# EAGLE board board (EAGLE 9.6.2)
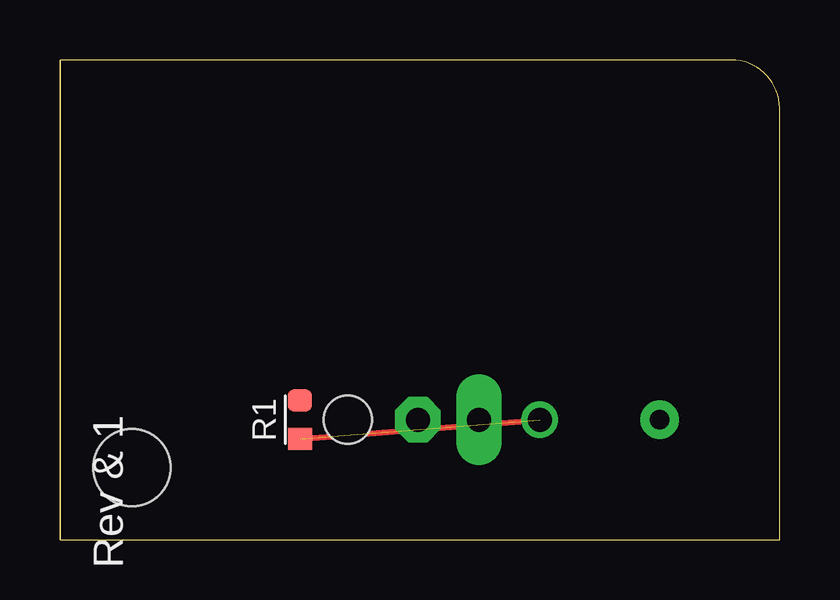
[diagram p0: board, top side]
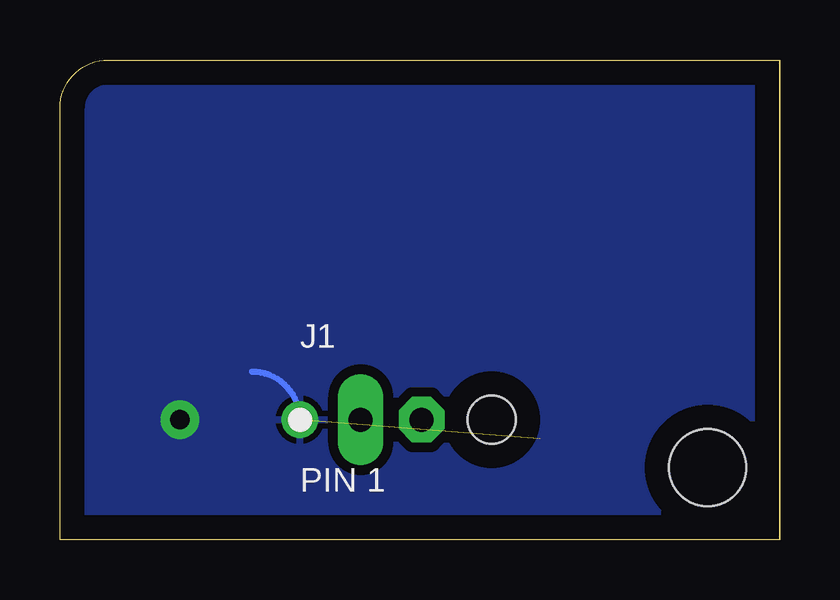
[diagram p1: board, bottom side, seen from below]

Size 30 x 20 mm. Coordinates in mm from the lower left corner, seen from the top.
Outline: 0,0 30,0 30,18 arc90 28,20 0,20
Outline: 0,20 0,0
Outline: 0,0 0,20
Copper layers (1*16): Top / Bottom
Design rules "demo": track to track 6mil, minimum pad ring 10mil, minimum via ring 8mil, stop-mask expansion 4mil, vias tented up to drill 0.5mm, thermal gap 10mil
Holes 3.2 mm at 3,3
layer 43: area 10,10 to 12,11

## Footprints (pad centres in the part's own frame; a part is rotated, then mirrored left to right if it is on the bottom)
HDR = drill 1: A 0,0 | drill 1 pad 1.9 long: B 2.54,0 | drill 1 pad 1.9 octagon: C 5.08,0 | hole 2: 8,0
R0603 = smd 0.9 x 1: 1 -0.8,0; 2 0.8,0

## Placement (x,y rotation side)
J1  [HDR]  20,5 0 bottom
R1  10k  [R0603]  10,5 90 top
X9  [MISSING]  0,0 0 top

## Library data of the parts
J1 = parts; PROD_ID: X-1
R1 X9 = parts

## Nets
GND: J1.A R1.1

## Tracks (layer width: path | path; a pad name or v marks a point on that pad's centre or on a via)
GND  (via drill 0.4, 0.8 pad 1.6)  (1 unrouted)
  Top 0.25: R1.1 J1.A
  Bottom 0.25: J1.A arc-90 22,7
  other vias: 20,5 25,5
  pour Bottom (isolate 0.4, rank 2): 1,1 29,1 29,19 arc90 1,19
  cutout Top: 5,5 8,5 8,8

## Text on the board
tPlace: Rev & 1